# Altium PCB 开源示例pcb_2023-02-22.pcbdoc
Units mil, origin at the board's own origin, x right, y up, seen from the top; angles counter-clockwise.
Board outline 2985 x 3451.02 mil, 2 copper layers (Top Layer, Bottom Layer); 41 components, 34 nets, 104 pads, 31 vias.
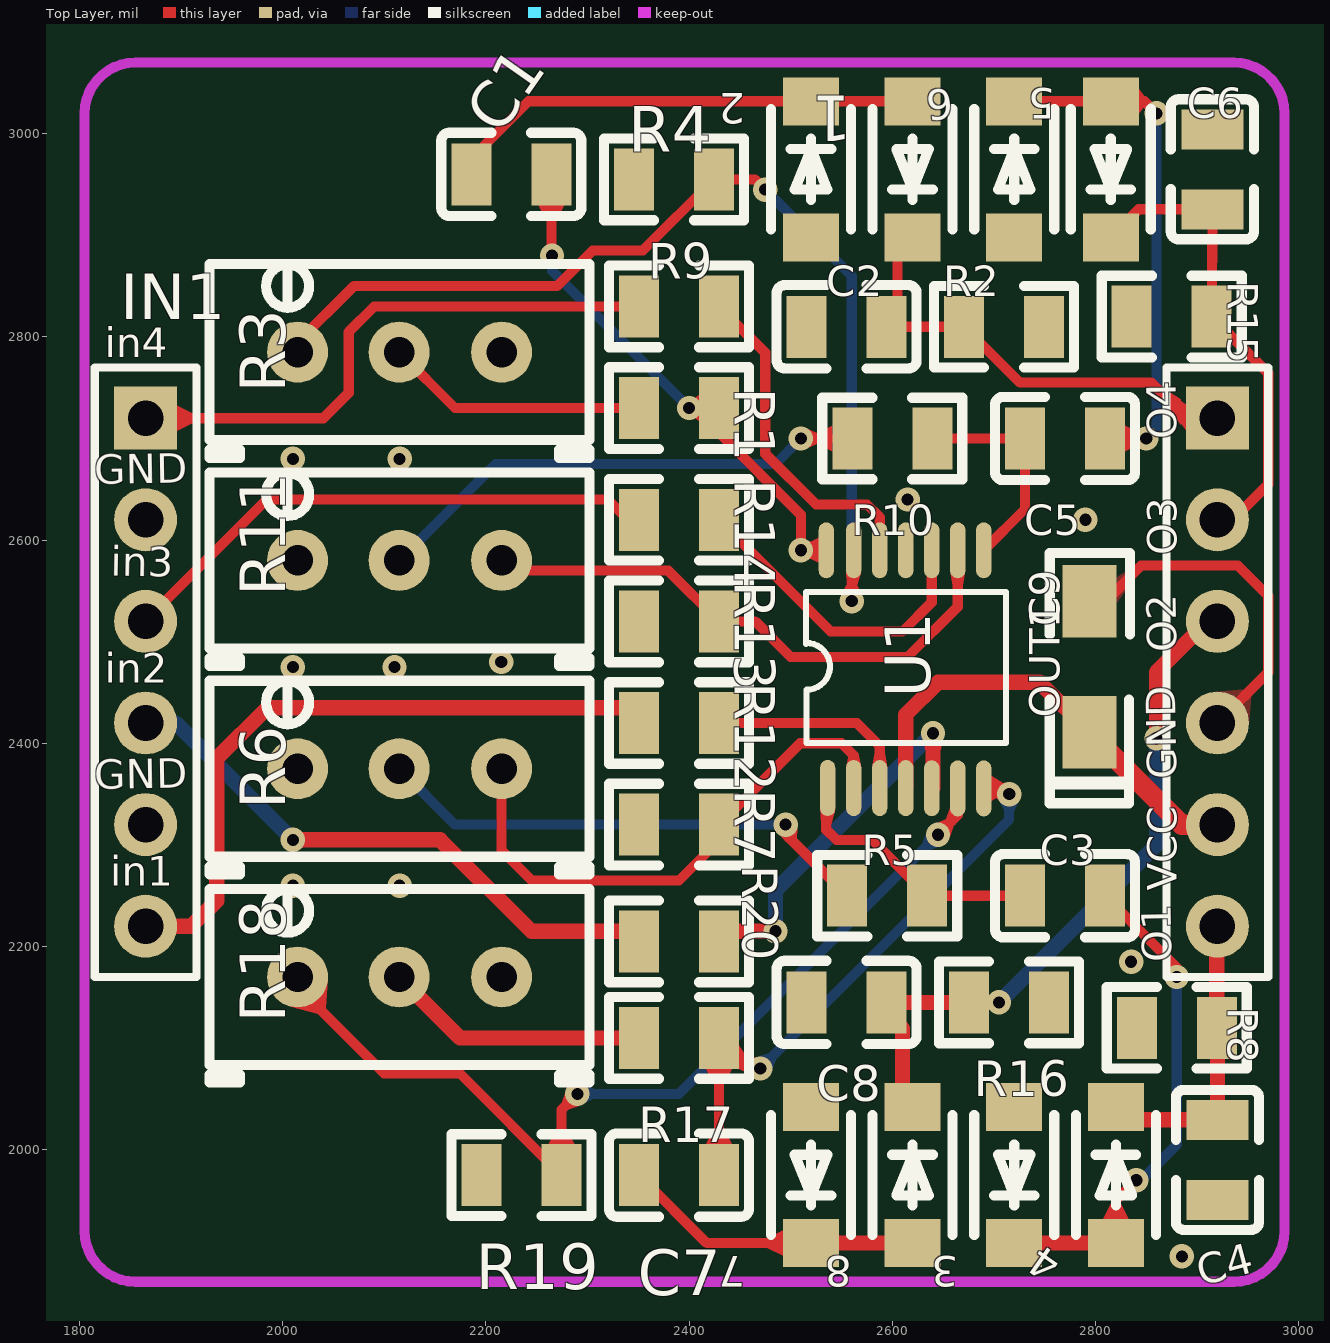
[diagram p0: Top Layer view]
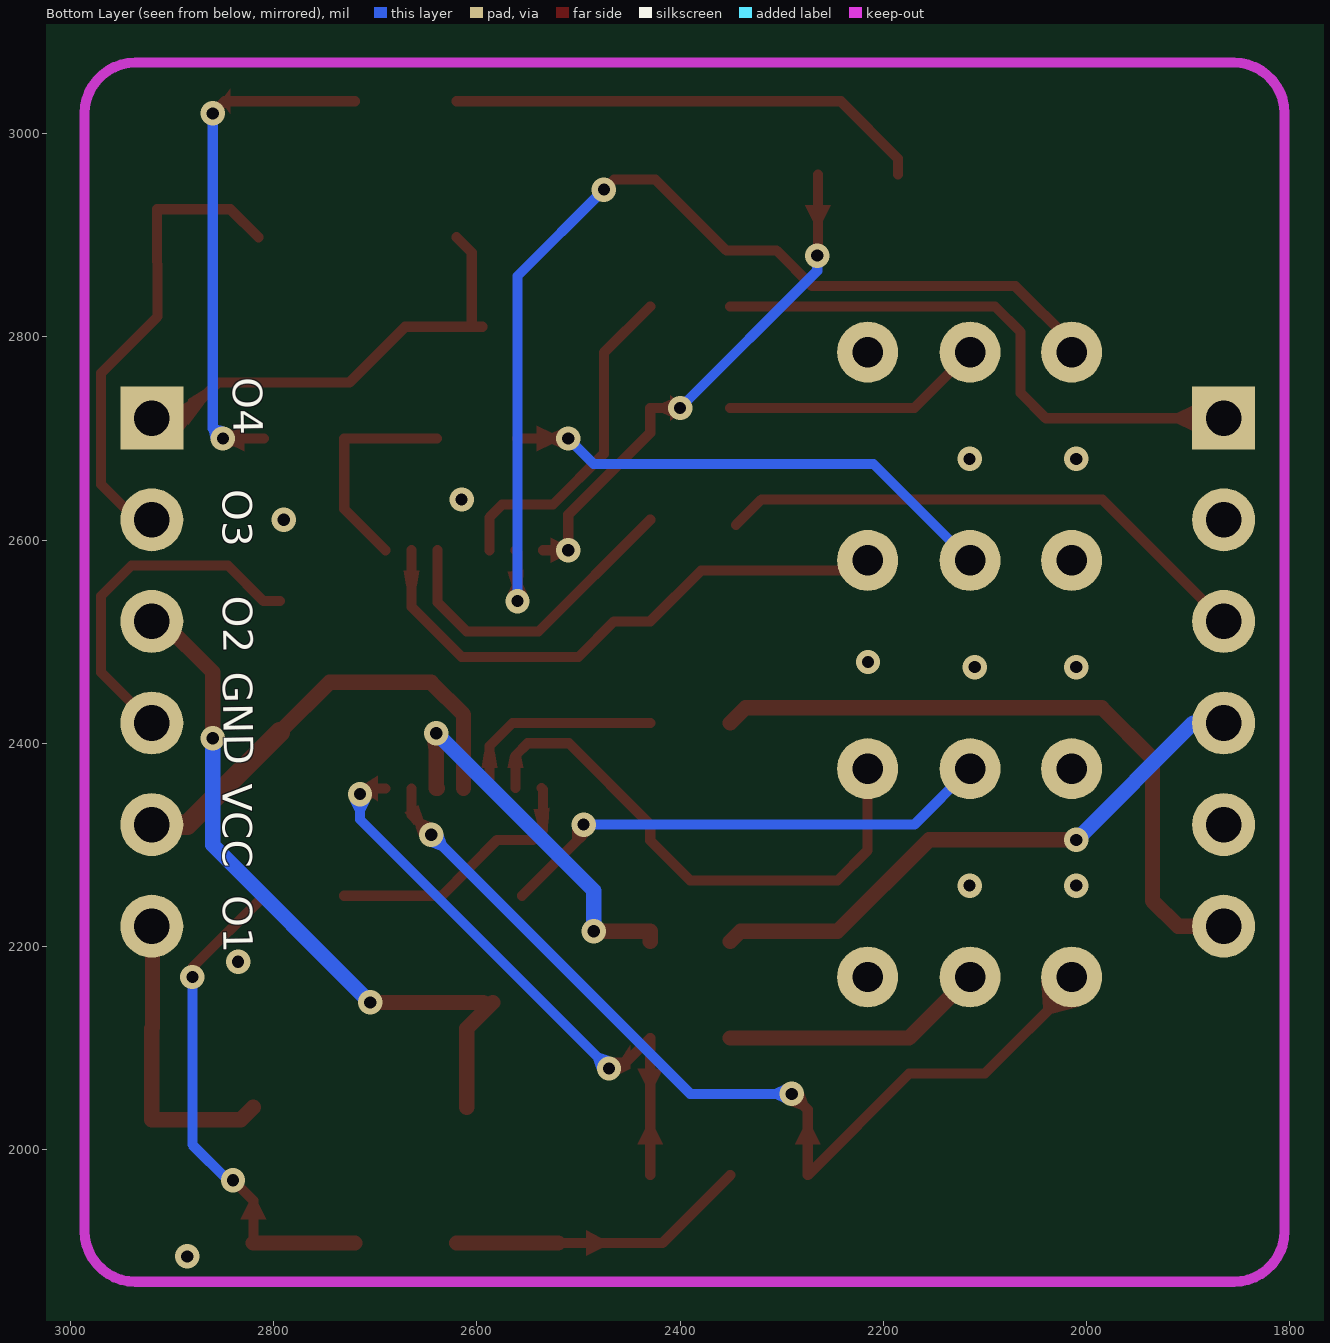
[diagram p1: Bottom Layer view, seen from below]

## Layer stack, top to bottom
Top Layer: signal copper (thickness not stored)
Dielectric: dielectric 12.6, FR-4, Dk 4.8
Bottom Layer: signal copper (thickness not stored)

## Board outline
3985,1000 1000,1000 1000,4451.02 3985,4451.02

## Components (designator, comment, footprint, x,y, rotation, side; value= is the part's Value field where it differs from the comment)
1 "1N5819W" SOD-123_L2.8-W1.8-LS3.7-RD 2620,2965 r90 top
2 "1N5819" SOD-123_L2.8-W1.8-LS3.7-RD 2520,2965 r270 top
3 "1N5819" SOD-123_L2.8-W1.8-LS3.7-RD 2720,1975 r90 top
4 "1N5819W" SOD-123_L2.8-W1.8-LS3.7-RD 2820,1975 r270 top
5 "1N5819W" SOD-123_L2.8-W1.8-LS3.7-RD 2815,2965 r90 top
6 "1N5819" SOD-123_L2.8-W1.8-LS3.7-RD 2720,2965 r270 top
7 "1N5819" SOD-123_L2.8-W1.8-LS3.7-RD 2520,1975 r90 top
8 "1N5819W" SOD-123_L2.8-W1.8-LS3.7-RD 2620,1975 r270 top
C1 "0.1u" C0805 2225,2960 r180 top
C2 "0.1u" C0805 2555,2810 r0 top
C3 "0.1u" C0805 2770,2250 r0 top
C4 "0.1u" C0805 2920,1990 r270 top
C5 "0.1u" C0805 2770,2700 r180 top
C6 "0.1u" C0805 2915,2965 r270 top
C7 "0.1u" C0805 2390,1975 r0 top
C8 "0.1u" C0805 2555,2145 r180 top
C9 "106" CASE-A_3216 2795,2480 r270 top
IN1 "IN" HDR-M-2.54_1X6 1865,2470 r270 top
OUT1 "OUT" HDR-M-2.54_1X6 2920,2470 r270 top
R1 "47k" R0805 2390,2730 r180 top
R2 "47k" R0805 2710,2810 r0 top
R3 "100K" RES-ADJ-TH_3296W 2115,2785 r90 top
R4 "1k" R0805 2385,2955 r180 top
R5 "47k" R0805 2595,2250 r0 top
R6 "100K" RES-ADJ-TH_3296W 2115,2375 r90 top
R7 "1k" R0805 2390,2320 r0 top
R8 "47k" R0805 2880,2120 r0 top
R9 "5.1k" R0805 2390,2830 r180 top
R10 "47k" R0805 2600,2700 r180 top
R11 "100K" RES-ADJ-TH_3296W 2115,2580 r90 top
R12 "5.1k" R0805 2390,2420 r0 top
R13 "1k" R0805 2390,2520 r180 top
R14 "5.1k" R0805 2390,2620 r180 top
R15 "47k" R0805 2875,2820 r180 top
R16 "47k" R0805 2715,2145 r180 top
R17 "47k" R0805 2390,2110 r0 top
R18 "100K" RES-ADJ-TH_3296W 2115,2170 r90 top
R19 "1k" R0805 2235,1975 r0 top
R20 "5.1k" R0805 2390,2205 r0 top
U1 "OPA4377" OPA4377 2610,2475 r90 top
? "" ? 2390,3515 r0 top

## Footprints (in the part's own frame and the unit in brackets; to place one, negate y for a bottom-side part, rotate by r counter-clockwise, add the part's x,y. Pads: shape width x height; smd on the part's side, far side on the other; paste and mask are expansions set on the pad)
C0805 [mm]
  rect 1x1.55 smd: 1(-1,0) 2(1,0)
  silkscreen extent -1.75,-1.04 1.75,1.04
CASE-A_3216 [mil]
  rect 71.5x53.5 smd: 1(69,-1) 2(-60,-1)
  silkscreen extent -107,-40 139,39
HDR-M-2.54_1X6 [mil]
  rect 62x62 hole 35: 1(-250,0)
  round 62 hole 35: 2(-150,0) 3(-50,0) 4(50,0) 5(150,0) 6(250,0)
  silkscreen extent -300,-50 300,50
OPA4377 [mm]
  oval 1.4x0.38 smd: 1(-3.021,1.87) 2(-3.023,1.22) 3(-3.024,0.57) 4(-3.026,-0.081) 5(-3.028,-0.731) 6(-3.03,-1.382) 7(-3.031,-2.032) 8(2.921,-2.032) 9(2.921,-1.382) 10(2.921,-0.731) 11(2.921,-0.081) 12(2.921,0.57) 13(2.921,1.22) 14(2.921,1.905)
  silkscreen extent -1.89,-2.59 1.88,2.41
R0805 [mm]
  rect 1x1.55 smd: 1(-1,0) 2(1,0)
  silkscreen extent -1.75,-1.02 1.75,1.02
RES-ADJ-TH_3296W [mil]
  round 60 hole 30: 1(0,100.39) 2(0,0.39) 3(0,-100.39)
  silkscreen extent -104,-187 87,187
SOD-123_L2.8-W1.8-LS3.7-RD [mm]
  rect 1.2x1.4 smd: 1(-1.7,0) 2(1.7,0)
  silkscreen extent -1.5,-1 1.5,1
? [mil]

## Via types
v1: diameter 24, hole 12, Top Layer to Bottom Layer, tented both sides, 31 vias

## Nets (pads, with @x,y where several pads share a name; then routed paths per layer and width w, separated by ;. In a path a pad name is that pad's centre, name@x,y a point inside that pad or via, vN(x,y) a via of type N, cw(c..) or ccw(c..) an arc to the next point about the centre after c; other vN are vias at no path point)
C1_2: 1.2 2.1 C1.2 | length 473.3
  Top Layer w10: C1.2 2185.6,2975.6 2241.9,3031.9 2.1 1.2
C5_1: 5.2 6.1 C5.1 | length 509.7
  Top Layer w10: 6.1 5.2 2848.1,3031.9 v1(2860,3020) ; C5.1 v1(2850,2700)
  Bottom Layer w10: v1(2850,2700) 2860,2710 v1(2860,3020)
D3_1: 3.1 4.2 C3.2 | length 498.9
  Top Layer w10: C3.2 2880,2179.37 v1(2880,2170) ; 4.2 2820,1950 v1(2840,1970)
  Top Layer w15: 3.1 4.2
  Bottom Layer w10: v1(2840,1970) 2845,1970 2880,2005 v1(2880,2170)
D7_1: 7.1 8.2 C7.1 | length 297.1
  Top Layer w10: C7.1 2417.5,1908.1 7.1
  Top Layer w15: 7.1 8.2
GND: 2.2 3.2 6.2 7.2 C2.1 C4.2 C6.1 C8.2 C9.2 IN1.2 IN1.5 OUT1.4 R2.2 R4.2 R7.1 R8.1 R13.2 R15.2 R16.1 R19.1 U1.11 | length 348.6
  Top Layer w10: C9.2 2810,2540 2845,2575 2940,2575 2970,2545 2970,2470 OUT1.4
  other v1: 2885,1895 2835,2185 2010,2260 2115,2260 2010,2475 2110,2475 2215,2480 2790,2620 2615,2640 2010,2680 2115,2680
IN1: IN1.6 R12.1 | length 662.9
  Top Layer w15: IN1.6 1910,2220 1935,2245 1935,2385 1985,2435 2335.6,2435 R12.1
IN2: IN1.4 R20.1 | length 574.7
  Top Layer w15: v1(2010,2305) 2155,2305 2245,2215 2340.6,2215 R20.1
  Bottom Layer w15: IN1.4 1895,2420 v1(2010,2305)
IN3: IN1.3 R14.2 | length 547.7
  Top Layer w10: IN1.3@1859.4,2515 1984.4,2640 2320,2640 R14.2@2345,2615
IN4: IN1.1 R9.2 | length 566.3
  Top Layer w10: IN1.1 2040,2720 2065,2745 2065,2805 2090,2830 R9.2
OUT1: 4.1 C4.1 OUT1.6 R8.2 | length 296.3
  Top Layer w15: 4.1 2832.5,2029.4 C4.1 2920,2119.4 R8.2 2919.4,2219.4 OUT1.6
OUT2: 8.1 C8.1 OUT1.3 R16.2 | length 694.2
  Top Layer w15: C8.1@2584.4,2145 2610,2119.4 8.1@2610,2041.9 ; C8.1@2593.8,2145 R16.2@2675,2145 ; R16.2@2665.6,2145 v1(2705,2145) ; v1(2860,2405) 2860,2470 OUT1.3@2910,2520
  Bottom Layer w15: v1(2705,2145) 2860,2300 v1(2860,2405)
OUT3: 5.1 C6.2 OUT1.2 R15.1 | length 469.5
  Top Layer w10: 5.1 2842.6,2925.6 C6.2 R15.1 2970,2764.4 2970,2655 2935,2620 OUT1.2
OUT4: 1.1 C2.2 OUT1.1 R2.1 | length 467.8
  Top Layer w10: 1.1 2605,2883.1 2605,2810 C2.2 R2.1 2725.6,2755 2855,2755 2890,2720 OUT1.1
R1_2: R1.2 R3.2 | length 258.8
  Top Layer w10: R3.2 2169.6,2730 R1.2
R3_3: R3.3
R5_1: R5.1 R6.2 | length 498.3
  Top Layer w10: v1(2495,2320) 2495,2310.6 R5.1
  Bottom Layer w10: R6.2 2169.6,2320 v1(2495,2320)
R6_1: R6.1
R10_2: R10.2 R11.2 | length 495.7
  Top Layer w10: v1(2510,2700) R10.2
  Bottom Layer w10: R11.2 2209.6,2675 2485,2675 v1(2510,2700)
R11_1: R11.1
R17_1: R17.1 R18.2 | length 260.9
  Top Layer w15: R18.2 2174.6,2110 R17.1
R18_3: R18.3
U1_1: C3.1 R5.2 U1.1 | length 264.4
  Top Layer w10: U1.1 2535,2354.7 2535,2315 2545,2305 2580,2305 R5.2 C3.1
U1_2: R6.3 R7.2 U1.2 | length 544.8
  Top Layer w10: R6.3 2215.4,2294.6 2245,2265 2390,2265 2429.4,2304.4 R7.2 ; R7.2@2431.9,2322.5 R7.2 ; U1.2 2562,2388 2550,2400 2509.4,2400 R7.2
U1_3: R12.2 U1.3 | length 209.1
  Top Layer w10: R12.2 2565,2420 2587.6,2397.4 U1.3
U1_5: R20.2 U1.5 | length 380.2
  Top Layer w15: R20.2 2429.4,2215 v1(2485,2215) ; U1.5 2640,2355.8 v1(2640,2410)
  Bottom Layer w15: v1(2485,2215) 2485,2255 v1(2640,2410)
U1_6: R18.1 R19.2 U1.6 | length 947
  Top Layer w10: R18.1 2014.6,2160.4 2100,2075 2174.4,2075 R19.2 2274.4,2039.4 v1(2290,2055) ; v1(2645,2310) 2664.4,2329.4 U1.6
  Bottom Layer w10: v1(2290,2055) 2390,2055 v1(2645,2310)
U1_7: C7.2 R17.2 U1.7 | length 586.8
  Top Layer w10: C7.2 R17.2 2459.4,2080 v1(2470,2080) ; U1.7 2709.4,2355.6 v1(2715,2350)
  Bottom Layer w10: v1(2470,2080) 2715,2325 v1(2715,2350)
U1_8: C5.2 R10.1 U1.8 | length 218
  Top Layer w10: R10.1 C5.2 2730.6,2630.6 U1.8
U1_9: R11.3 R13.1 U1.9 | length 570.3
  Top Layer w10: R11.3 2215.4,2570 2379.4,2570 R13.1 2465,2520 2500,2485 2615,2485 2664.4,2534.4 U1.9
U1_10: R14.1 U1.10 | length 318.1
  Top Layer w10: R14.1 2539.4,2510 2610,2510 2638.8,2538.8 U1.10
U1_12: R9.1 U1.12 | length 334.8
  Top Layer w10: R9.1 2475,2784.4 2475,2685 2525,2635 2575,2635 2587.6,2622.4 U1.12
U1_13: R3.1 R4.1 U1.13 | length 1031.6
  Top Layer w10: R3.1 2014.6,2794.6 2070,2850 2270,2850 2305,2885 2354.4,2885 R4.1 2465,2955 v1(2475,2945) ; v1(2560,2540) 2560,2588 U1.13
  Bottom Layer w10: v1(2475,2945) 2560,2860 v1(2560,2540)
U1_14: C1.1 R1.1 U1.14 | length 514
  Top Layer w10: C1.1 2264.4,2880.6 v1(2265,2880) ; v1(2400,2730) R1.1 2429.4,2705.6 2510,2625 v1(2510,2590) U1.14
  Bottom Layer w10: v1(2265,2880) 2265,2865 v1(2400,2730)
VCC: C9.1 OUT1.5 U1.4 | length 450.3
  Top Layer w15: U1.4 2613.2,2428.2 2645,2460 2745,2460 C9.1
  Top Layer w20: C9.1 2885,2320 OUT1.5

## Polygon pours and split planes (outlines as drawn)
GND on Bottom Layer (solid): 1575,3310 3470,3310 3485,3295 3485,1500 3480,1505 1575,1505 1585,1515 1585,1530
GND on Top Layer (solid): 1500,3370 3395,3370 3410,3355 3410,1560 3405,1565 1500,1565 1510,1575 1510,1590

## Keep-outs
Keep-Out Layer:
  lines w10: 1805,1920 ccw(c1855,1920) 1855,1870 ; 1805,3020 cw(c1855,3020) 1855,3070 ; 2936.1,1870 ccw(c2936.1,1920) 2986.1,1920 ; 2936.1,3070 cw(c2936.1,3020) 2986.1,3020

## Other copper
Top Layer:
  region net U1_6: 2044.44,2166.87 2007.77,2140.79 2034.15,2133.78 2042.41,2139.66
  region net OUT4: 2889,2708.5 2889,2733.5 2874,2743.07 2874,2728.93
  region net OUT4: 2884,2713.5 2884,2738.5 2869,2748.07 2869,2733.93
  region net IN4: 1896,2732.5 1896,2707.5 1911,2715 1911,2725
  region net D3_1: 2807.5,1931.7 2832.5,1931.7 2825,1946.7 2815,1946.7
  region net U1_1: 2543.81,2335.31 2528.91,2336.67 2530,2321.51 2540,2320.6
  region net U1_3: 2595.05,2376.01 2580.09,2376.01 2582.57,2391.01 2592.57,2391.01
  region net U1_2: 2569.45,2376.08 2554.49,2376.08 2556.97,2388.03 2566.97,2388.03
  region net U1_6: 2671,2332.15 2657.78,2339.14 2652.75,2324.82 2662.01,2319.93
  region net U1_7: 2697.48,2368.15 2697.48,2343.15 2709.35,2350.65 2709.35,2360.65
  region net U1_14: 2527.52,2577.5 2527.52,2602.5 2512.52,2595 2512.52,2585
  region net U1_13: 2569.38,2568.94 2554.55,2570.9 2555,2555.71 2565,2554.39
  region net U1_9: 2671.87,2569.92 2656.91,2569.92 2659.39,2554.92 2669.39,2554.92
  region net U1_6: 2261.87,2005.5 2286.87,2005.5 2279.37,2020.5 2269.37,2020.5
  region net U1_7: 2441.87,2079.49 2416.87,2079.49 2424.37,2064.49 2434.37,2064.49
  region net U1_7: 2449.05,2102.82 2449.05,2079.49 2455.84,2076.46 2459.37,2087.07
  region net R10_2: 2540.95,2687.5 2540.95,2712.5 2525.95,2705 2525.95,2695
  region net U1_14: 2409.68,2717.5 2409.68,2742.5 2400,2735 2400,2725
  region net D7_1: 2492.4,1895.6 2492.4,1920.6 2477.4,1913.1 2477.4,1903.1
  region net C5_1: 2842.56,3044.43 2842.56,3019.43 2848.07,3026.93 2848.07,3036.93
  region net U1_7: 2416.87,2005.5 2441.87,2005.5 2434.37,2020.5 2424.37,2020.5
  region net C5_1: 2829.1,2712.5 2829.1,2687.5 2844.1,2695 2844.1,2705
  region net U1_14: 2276.87,2929.5 2251.87,2929.5 2259.37,2914.5 2269.37,2914.5
  region net U1_14: 2517.94,2581 2517.94,2599 2526.34,2595 2526.34,2585
  region net U1_13: 2551,2547.94 2569,2547.94 2565,2556.34 2555,2556.34
  region net C5_1: 2842.06,2691 2842.06,2709 2833.66,2705 2833.66,2695
  region net U1_14: 2407.94,2721 2407.94,2739 2416.34,2735 2416.34,2725
  region net R10_2: 2517.94,2691 2517.94,2709 2526.34,2705 2526.34,2695
  region net U1_5: 2631,2402.06 2649,2402.06 2647.5,2393.66 2632.5,2393.66
  region net R5_1: 2489.46,2309.36 2506.25,2315.83 2505.98,2306.72 2495.77,2302.79
  region net U1_7: 2465.16,2090.98 2459.71,2073.82 2452.72,2079.57 2456.13,2090.31
  region net U1_7: 2710.66,2361.19 2704.44,2344.3 2697.83,2350.65 2701.51,2360.65
  region net U1_6: 2656.98,2309.25 2644.25,2321.98 2653.02,2325.09 2660.09,2318.02
  region net U1_6: 2290.75,2043.02 2278.02,2055.75 2274.91,2046.98 2281.98,2039.91
Bottom Layer:
  region net C5_1: 2861.98,2699.25 2849.25,2711.98 2856.47,2713.53 2863.54,2706.46
  region net U1_7: 2481.98,2079.25 2469.25,2091.98 2478.02,2095.09 2485.09,2088.02
  region net U1_7: 2706,2342.06 2724,2342.06 2720,2333.66 2710,2333.66
  region net U1_6: 2645.75,2298.02 2633.02,2310.75 2629.91,2301.98 2636.98,2294.91
  region net U1_6: 2297.94,2046 2297.94,2064 2306.34,2060 2306.34,2050

## Silkscreen, mask and mechanical layers (free items; w line width, h text height)
Top Overlay:
  text "in4" at 1825,2770 h50
  text "O4" at 2890,2700 h50 r91
  text "GND" at 1815,2645 h50 r1
  text "O3" at 2890,2585 h50 r90
  text "in3" at 1830,2555 h50 r359
  text "O2" at 2890,2490 h50 r91
  text "in2" at 1825,2450 h50
  text "GND" at 2890,2365 h50 r91
  text "GND" at 1815,2345 h50 r1
  text "VCC" at 2890,2255 h50 r90
  text "in1" at 1830,2250 h50
  text "O1" at 2885,2185 h50 r91
Bottom Overlay:
  text "O4" at 2850,2760 h50 r89
  text "O3" at 2860,2650 h50 r90
  text "O2" at 2860,2545 h50 r89
  text "GND" at 2860,2470 h50 r89
  text "VCC" at 2860,2360 h50 r90
  text "O1" at 2860,2250 h50 r89